# Altium PCB KH-TYPE-C-16P.pcbdoc
Units mm, origin at the board's own origin, x right, y up, seen from the top; angles counter-clockwise.
Board outline 23.04 x 20.85 mm, 2 copper layers (Top Layer, Bottom Layer), stack 0 mm thick; 1 components, 0 nets, 20 pads, 0 vias.
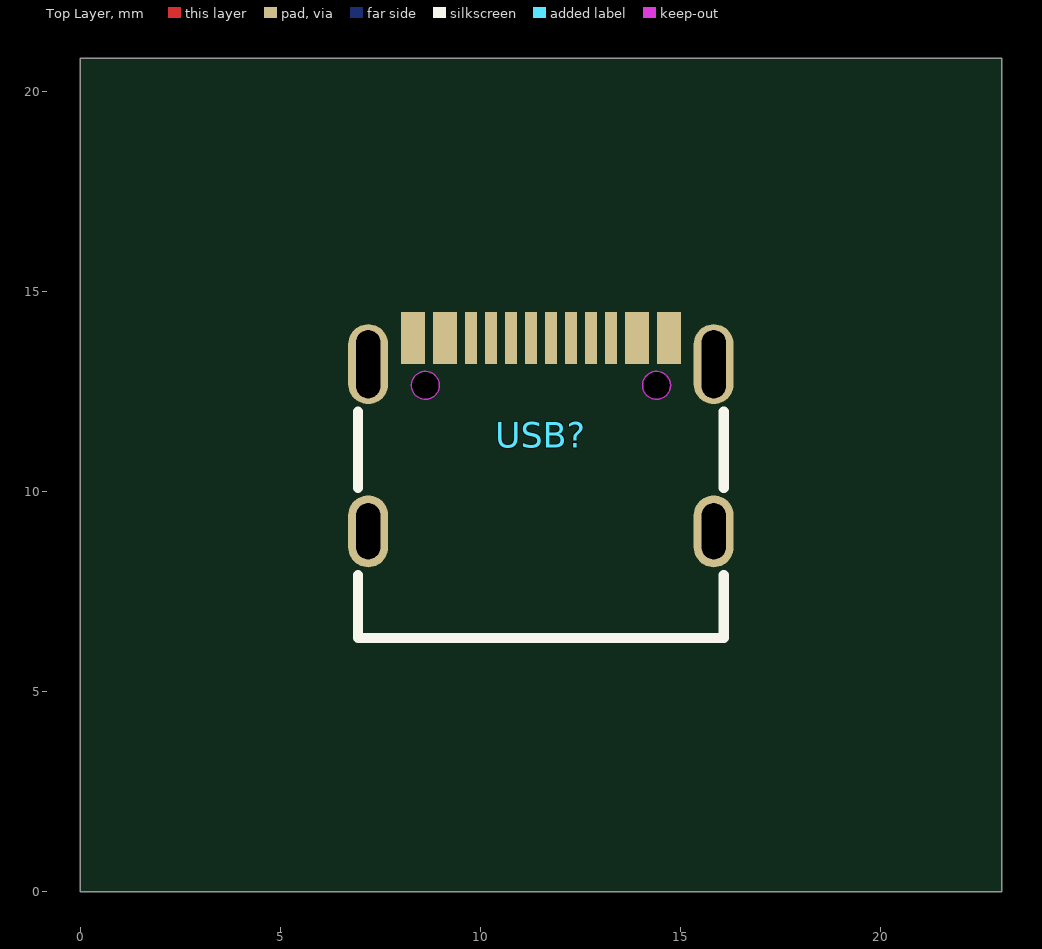
[diagram p0: Top Layer view]
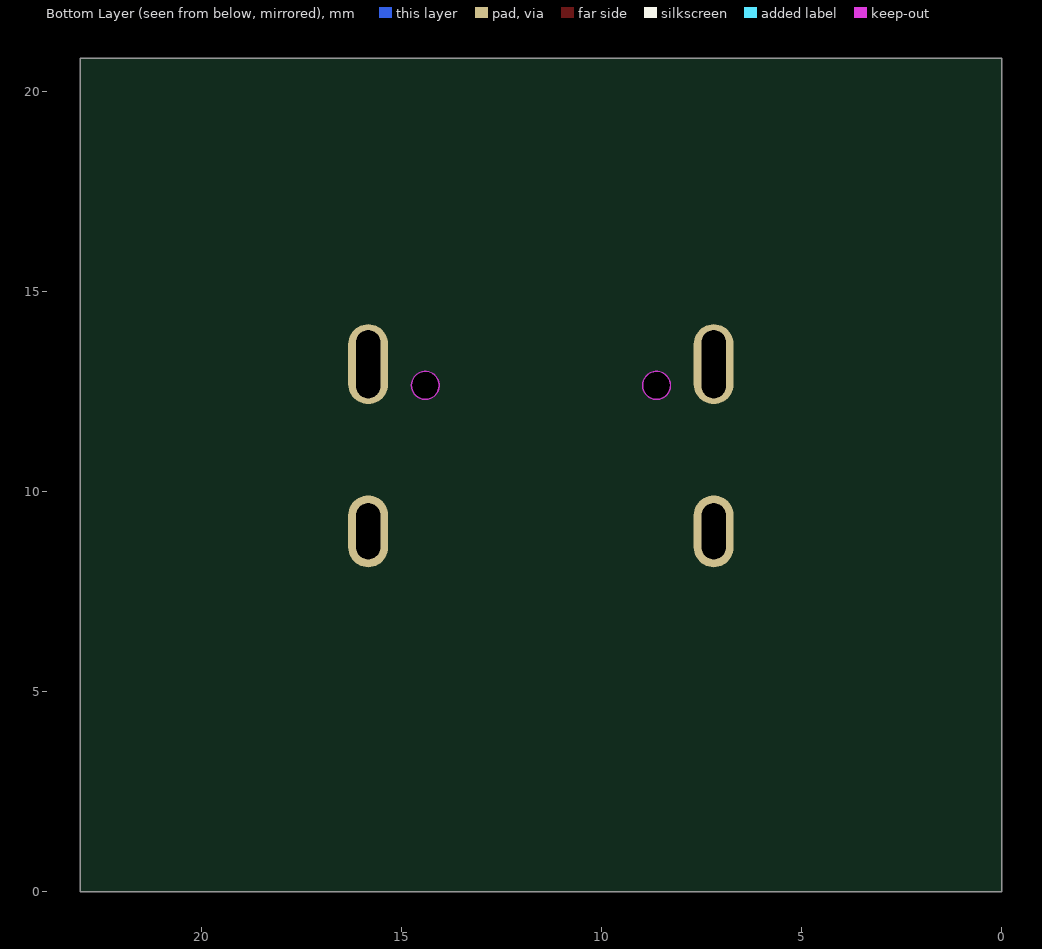
[diagram p1: Bottom Layer view, seen from below]

## Layer stack, top to bottom
Top Layer: signal copper (thickness not stored)
Bottom Layer: signal copper (thickness not stored)

## Board outline
23.04,0 0,0 0,20.845 23.04,20.845

## Design rules (kind name [scope] priority, off if disabled: settings)
PasteMaskExpansion "Paste Mask Expansion" [All] p1: expansion=0
SolderMaskExpansion "Solder Mask Expansion" [IsVia] p1: expansion=-25.4 istentingtop=TRUE
SolderMaskExpansion "Solder Mask Expansion" [All] p2: expansion=0.051 istentingtop=FALSE

## Components (designator, comment, footprint, x,y, rotation, side; value= is the part's Value field where it differs from the comment)
USB? "KH-TYPE-C-16P" USB-C-SMD_KH-TYPE-C-16P 11.52,11.43 r0 top

## Footprints (in the part's own frame and the unit in brackets; to place one, negate y for a bottom-side part, rotate by r counter-clockwise, add the part's x,y. Pads: shape width x height; smd on the part's side, far side on the other; paste and mask are expansions set on the pad)
USB-C-SMD_KH-TYPE-C-16P [mm]
  oval 1x2 hole 0.6 slot 1.7 at 90 deg: 1(-4.32,1.765) 2(4.32,1.765)
  oval 1x1.8 hole 0.6 slot 1.4 at 90 deg: 3(-4.32,-2.415) 4(4.32,-2.415)
  rect 0.3x1.3 smd paste-100 mask+0.05: A1(-3.35,2.415) A4(-2.55,2.415) A5(-1.25,2.415) A6(-0.25,2.415) A7(0.25,2.415) A8(1.25,2.415) A9(2.55,2.415) A12(3.35,2.415) B1(3.05,2.415) B4(2.25,2.415) B5(1.75,2.415) B6(0.75,2.415) B7(-0.75,2.415) B8(-1.75,2.415) B9(-2.25,2.415) B12(-3.05,2.415)
  Board Outline Layer circle w0.003: c-2.89,1.235 r0.35
  Board Outline Layer circle w0.003: c2.89,1.235 r0.35
  Board Outline Layer region: -2.54,1.235 -2.575,1.083 -2.672,0.961 -2.812,0.894 -2.968,0.894 -3.108,0.961 -3.205,1.083 -3.24,1.235 -3.24,1.235 -3.205,1.387 -3.108,1.509 -2.968,1.576 -2.812,1.576 -2.672,1.509 -2.575,1.387 -2.54,1.235
  Board Outline Layer region: -2.54,1.235 -2.549,1.157 -2.575,1.083 -2.616,1.017 -2.672,0.961 -2.738,0.92 -2.812,0.894 -2.89,0.885 -2.968,0.894 -3.042,0.92 -3.108,0.961 -3.164,1.017 -3.205,1.083 -3.231,1.157 -3.24,1.235 -3.231,1.313 -3.205,1.387 -3.164,1.453 -3.108,1.509 -3.042,1.55 -2.968,1.576 -2.89,1.585 -2.812,1.576 -2.738,1.55 -2.672,1.509 -2.616,1.453 -2.575,1.387 -2.549,1.313
  Board Outline Layer region: 3.24,1.235 3.205,1.083 3.108,0.961 2.968,0.894 2.812,0.894 2.672,0.961 2.575,1.083 2.54,1.235 2.54,1.235 2.575,1.387 2.672,1.509 2.812,1.576 2.968,1.576 3.108,1.509 3.205,1.387 3.24,1.235
  Board Outline Layer region: 3.24,1.235 3.231,1.157 3.205,1.083 3.164,1.017 3.108,0.961 3.042,0.92 2.968,0.894 2.89,0.885 2.812,0.894 2.738,0.92 2.672,0.961 2.616,1.017 2.575,1.083 2.549,1.157 2.54,1.235 2.549,1.313 2.575,1.387 2.616,1.453 2.672,1.509 2.738,1.55 2.812,1.576 2.89,1.585 2.968,1.576 3.042,1.55 3.108,1.509 3.164,1.453 3.205,1.387 3.231,1.313
  Multi-Layer board cut-out: -2.54,1.235 -2.575,1.083 -2.672,0.961 -2.812,0.894 -2.968,0.894 -3.108,0.961 -3.205,1.083 -3.24,1.235 -3.24,1.235 -3.205,1.387 -3.108,1.509 -2.968,1.576 -2.812,1.576 -2.672,1.509 -2.575,1.387 -2.54,1.235
  Multi-Layer board cut-out: 3.24,1.235 3.205,1.083 3.108,0.961 2.968,0.894 2.812,0.894 2.672,0.961 2.575,1.083 2.54,1.235 2.54,1.235 2.575,1.387 2.672,1.509 2.812,1.576 2.968,1.576 3.108,1.509 3.205,1.387 3.24,1.235
  silkscreen extent -4.57,-5.08 4.57,0.57

## Nets (pads, with @x,y where several pads share a name; then routed paths per layer and width w, separated by ;. In a path a pad name is that pad's centre, name@x,y a point inside that pad or via, vN(x,y) a via of type N, cw(c..) or ccw(c..) an arc to the next point about the centre after c; other vN are vias at no path point)
pads on no net: USB?.1 USB?.2 USB?.3 USB?.4 USB?.A1 USB?.A4 USB?.A5 USB?.A6 USB?.A7 USB?.A8 USB?.A9 USB?.A12 USB?.B1 USB?.B4 USB?.B5 USB?.B6 USB?.B7 USB?.B8 USB?.B9 USB?.B12